# Altium PCB SensorBoard.PcbDoc
Units mil, origin at the board's own origin, x right, y up, seen from the top; angles counter-clockwise.
Board outline 3695 x 402.52 mil, 2 copper layers (Top Layer, Bottom Layer), stack 60.477 mil thick; 7 components, 4 nets, 22 pads, 23 vias.
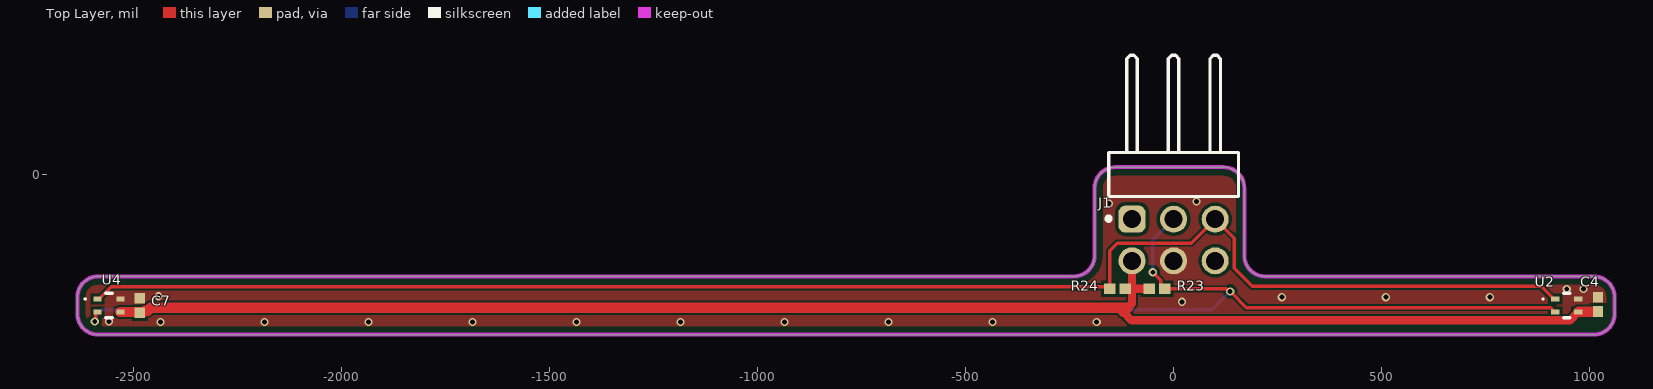
[diagram p0: Top Layer view]
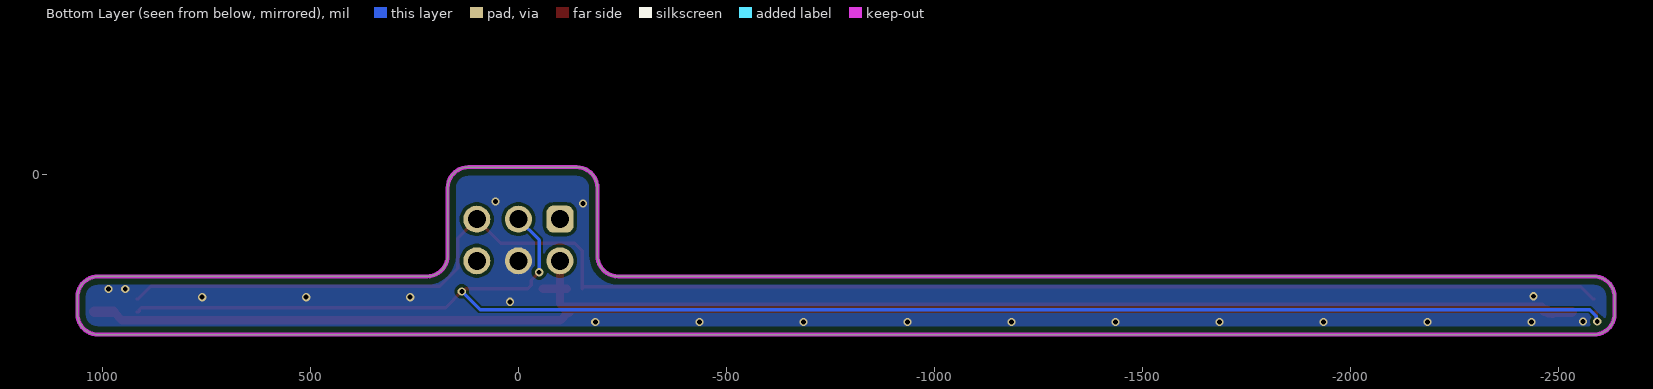
[diagram p1: Bottom Layer view, seen from below]

## Layer stack, top to bottom
Top Solder: solder mask 0.4, Solder Resist, Dk 3.5
Top Layer: signal copper 1.4
Dielectric 1: dielectric 57.6772, FR-4, Dk 4.8
Bottom Layer: signal copper 1.4
Bottom Solder: solder mask 0.4, Solder Resist, Dk 3.5

## Board outline
-2635,-335 -2635,-295 cw(c-2585,-295) -2585,-245 -240,-245 ccw(c-240,-195) -190,-195 -190,-32.48 cw(c-140,-32.48) -140,17.52 120,17.52 cw(c120,-32.48) 170,-32.48 170,-195 ccw(c220,-195) 220,-245 1010,-245 cw(c1010,-295) 1060,-295 1060,-335 cw(c1010,-335) 1010,-385 -2570,-385 -2585,-385 cw(c-2585,-335)

## Design rules (kind name [scope] priority, off if disabled: settings)
AssemblyTestPointUsage AssemblyTestPointUsage_1 [All] p2:
AssemblyTestpoint AssemblyTestpoint_1 [All] p2: testpointundercomponent=TRUE minsize=40 maxsize=100 preferedsize=60 minholesize=0 maxholesize=40 preferedholesize=32 testpointgrid=1 usegrid=TRUE gridtolerance=0.01 allowsidetop=TRUE allowsidebottom=TRUE
Clearance "Board outline clearance" [All vs OnLayer('Keep-Out Layer')] p1: gap=15 ignorepadtopadclearanceinfootprint=FALSE except(0: Arc-Hole Track-Hole SMDPad-Hole THPad-Hole Via-Hole Fill-Hole Poly-Hole Region-Hole Text-Hole)
Clearance Clearance_1 [All] p2: gap=7.87 ignorepadtopadclearanceinfootprint=FALSE except(0: Arc-Text Track-Text SMDPad-Text THPad-Text Via-Text Fill-Text Poly-Text Region-Text Text-Text; 4: Arc-Arc Arc-Track Arc-SMDPad Track-Track Track-SMDPad; 5: Arc-THPad Arc-Via Arc-Fill Arc-Poly Arc-Region Arc-Hole Track-THPad Track-Via Track-Fill Track-Poly Track-Region Track-Hole SMDPad-Hole THPad-Hole; 6: SMDPad-SMDPad; 8: SMDPad-THPad THPad-THPad; 10: Via-Via)
ComponentClearance [InComponent('L1')] p1: gap=0 collisioncheckmode=3 verticalgap=10 showdistances=FALSE
ComponentClearance UFL [InComponent('RF_CON1')] p2: gap=0 collisioncheckmode=3 verticalgap=10 showdistances=FALSE
ComponentClearance ComponentClearance_1 [All] p3: gap=10 collisioncheckmode=3 verticalgap=10 showdistances=FALSE
DiffPairsRouting DiffPairsRouting_1 [InDifferentialPair('D')] p1: maxlimit=11.81 minlimit=5 mostfreqgap=11.81 toplayer_minwidth=4 toplayer_maxwidth=5.83 toplayer_prefwidth=5 bottomlayer_minwidth=4 bottomlayer_maxwidth=5.83 bottomlayer_prefwidth=5 impedanceprofiledriven=TRUE maxuncoupledlength=500
FabricationTestPointUsage FabricationTestPointUsage_1 [All] p2: valid=0 allowmultiple=FALSE
FabricationTestpoint FabricationTestpoint_1 [All] p2: side=3 testpointundercomponent=TRUE minsize=40 maxsize=100 preferedsize=60 minholesize=0 maxholesize=40 preferedholesize=32 testpointgrid=1 allowsidetop=TRUE allowsidebottom=TRUE usegrid=TRUE gridtolerance=0.01
FanoutControl Fanout_LCC [IsLCC] p1: bgadir=Out bgaviamode=Centered fanoutstyle=Auto fanoutdirection=Alternating viagrid=1 // Fanout_LCC (Default Rule)
FanoutControl Fanout_BGA [IsBGA] p2: bgadir=Out bgaviamode=Centered fanoutstyle=Auto fanoutdirection=Alternating viagrid=1 // Fanout_BGA (Default Rule)
FanoutControl Fanout_Small [(CompPinCount < 5)] p3: bgadir=Out bgaviamode=Centered fanoutstyle=Auto fanoutdirection=OutThenIn viagrid=1 // Fanout_Small (Default Rule)
FanoutControl Fanout_SOIC [IsSOIC] p4: bgadir=Out bgaviamode=Centered fanoutstyle=Auto fanoutdirection=Alternating viagrid=1 // Fanout_SOIC (Default Rule)
FanoutControl Fanout_BGA_1 [IsBGA] p6: bgadir=Out bgaviamode=Centered fanoutstyle=Auto fanoutdirection=Alternating viagrid=1 // Fanout_BGA (Default Rule)
FanoutControl Fanout_LCC_1 [IsLCC] p7: bgadir=Out bgaviamode=Centered fanoutstyle=Auto fanoutdirection=Alternating viagrid=1 // Fanout_LCC (Default Rule)
FanoutControl Fanout_SOIC_1 [IsSOIC] p8: bgadir=Out bgaviamode=Centered fanoutstyle=Auto fanoutdirection=Alternating viagrid=1 // Fanout_SOIC (Default Rule)
FanoutControl Fanout_Small_1 [(CompPinCount < 5)] p9: bgadir=Out bgaviamode=Centered fanoutstyle=Auto fanoutdirection=OutThenIn viagrid=1 // Fanout_Small (Default Rule)
FanoutControl Fanout_Default_1 [All] p10: bgadir=Out bgaviamode=Centered fanoutstyle=Auto fanoutdirection=Alternating viagrid=1 // Fanout_Default (Default Rule)
Height Height_1 [All] p1: minheight=0 maxheight=1968.5 prefheight=500
HoleSize HoleSize_1 [All] p1: absolutevalues=TRUE maxlimit=590.55 minlimit=7.87 maxpercent=80.000 minpercent=20.000
HoleToHoleClearance u8 [All vs InComponent('u8_1')] p1: gap=0 allowstackedmicrovias=TRUE
HoleToHoleClearance [All] p2: gap=10 allowstackedmicrovias=TRUE
LayerPairs LayerPairs_1 [All] p1: enforce=TRUE
MinimumAnnularRing [All] p1: minimumring=3.94
MinimumSolderMaskSliver MinimumSolderMaskSliver_1 [All] p1 off: minsoldermaskwidth=7.87
NetAntennae NetAntennae_1 [All] p2: netantennaetolerance=0
PasteMaskExpansion PasteMaskExpansion_1 [All] p2: expansion=0
PlaneClearance PlaneClearance_1 [All] p1: clearance=20
PlaneConnect PlaneConnect_1 [All] p1: planeconnectstyle=Direct reliefexpansion=20 reliefentries=4 reliefconductorwidth=27.56 reliefairgap=10
PolygonConnect [All] p1: connectstyle=Direct reliefconductorwidth=20 reliefentries=4 polygonreliefangle="90 Angle" airgapwidth=10
RoutingCorners RoutingCorners_1 [All] p2: cornerstyle=45-Degree minsetback=100 maxsetback=100
RoutingLayers RoutingLayers_1 [All] p2: top layer_v5=TRUE bottom layer_v5=TRUE
RoutingPriority RoutingPriority_1 [All] p2: routingpriority=0
RoutingTopology RoutingTopology_1 [All] p2: topology=Shortest
RoutingVias RoutingVias_1 [All] p1: holewidth=11.81 width=19.68 viastyle="Through Hole" minholewidth=7.87 minwidth=15.75 maxholewidth=28 maxwidth=50
ShortCircuit ShortCircuit_Antenna [InComponent('J1')] p1: allowed=TRUE
ShortCircuit ShortCircuit_1 [All] p2: allowed=FALSE
SilkToSilkClearance SilkToSilkClearance_1 [All] p1: silktosilkclearance=0
SilkToSolderMaskClearance SilkToSolderMaskClearance_1 [IsPad] p1: minsilkscreentomaskgap=0 clearancetoexposedcopper=TRUE
SolderMaskExpansion [All] p1: expansion=4 istentingtop=FALSE
SolderMaskExpansion SolderMaskExpansion_1 [All] p2: expansion=4 istentingtop=FALSE
SupplyNets "Schematic Supply Nets_9" [InNet('3v3_dig@2A')] p1: voltage=0.000
SupplyNets "Schematic Supply Nets" [InNet('DGND')] p2: voltage=0.000
UnRoutedNet UnRoutedNet_1 [All] p1:
UnpouredPolygon UnpouredPolygon_1 [All] p2:
Width Width_1 [All] p1: maxlimit=314.96 minlimit=3.94 preferedwidth=7.87
13 further rules are at their usual default settings.

## Classes and differential pairs
component class Sensors: C4 C7 J1 U2 U4

## Components (designator, comment, footprint, x,y, rotation, side; value= is the part's Value field where it differs from the comment)
C4 "100nF 0402 X7R 50V" CAPC1005X55X25NL5T10 1020,-312.32 r270 top
C7 "100nF 0402 X7R 50V" CAPC1005X55X25NL5T10 -2485,-315 r270 top
J1 "61300621021" 61300621021 0,0 r180 top
R23 "4k7 0402 1%" RESC1005X40X25ML05T10 -40,-275 r0 top
R24 "4k7 0402 1%" RESC1005X40X25ML05T10 -135,-275 r180 top
U2 "SHT40-AD1B-R3" SHT40AD1BR3 944.88,-314.96 r0 top
U4 "SHT40-CD1B-R3" SHT40CD1BR3 -2559.06,-314.96 r0 top

## Footprints (in the part's own frame and the unit in brackets; to place one, negate y for a bottom-side part, rotate by r counter-clockwise, add the part's x,y. Pads: shape width x height; smd on the part's side, far side on the other; paste and mask are expansions set on the pad)
61300621021 [mm] "Pin Header, pitch 2.54 mm, THT, Angled, dual row, 6p"
  rrect50% 1.65x1.65 hole 1.1: 1(2.54,2.73)
  round 1.65 hole 1.1: 2(2.54,5.27) 3(0,2.73) 4(0,5.27) 5(-2.54,2.73) 6(-2.54,5.27)
  silkscreen extent -3.96,-7.27 4.09,2.82, body extent -3.81,-7.27 3.81,5.63, height 5.12
CAPC1005X55X25NL5T10 [mm] "Chip Capacitor, 2-Leads, Body 1.05x0.55mm, IPC Medium Density"
  rect 0.66x0.62 smd: 1(-0.44,0) 2(0.44,0)
  body extent -0.53,-0.28 0.53,0.28, height 0.55
RESC1005X40X25ML05T10 [mm] "Chip Resistor, 2-Leads, Body 1.00x0.50mm, IPC Low Density"
  rect 0.7x0.65 smd: 1(-0.475,0) 2(0.475,0)
  body extent -0.53,-0.27 0.53,0.28, height 0.4
SHT40AD1BR3 [mm]
  rect 0.5x0.3 smd: 1(-0.7,0.4) 2(-0.7,-0.4) 3(0.7,-0.4) 4(0.7,0.4)
  silkscreen extent -1.5,-0.75 0.2,0.75, body extent -0.75,-0.75 0.75,0.75, height 0.54
SHT40CD1BR3 [mm]
  rect 0.5x0.3 smd: 1(-0.7,0.4) 2(-0.7,-0.4) 3(0.7,-0.4) 4(0.7,0.4)
  silkscreen extent -1.5,-0.75 0.2,0.75, body extent -0.75,-0.75 0.75,0.75, height 0.69

## Part data
C4 C7: library part CMP-1662-00020-1, LCSC_PN=C77020, ComponentLink1Description="Manufacturer URL", ComponentLink1URL=http://www.murata.com/, ComponentLink2Description=Datasheet, ComponentLink2URL=http://psearch.en.murata.com/capacitor/product/GRM155R60J105KE19%23.pdf
J1: library part CMP-1502-01071-5, "THT Angled Pin Header WR-PHD, Pitch 2.54 mm, Dual Row, 6 pins", Color=Black, Contact Resistance=20mΩ, Current Rating=3A, LCSC_PN=C239334, Max Operating Temperature=105°C, Min Operating Temperature=-40°C, Operating Supply Voltage=250V, Connector Type="Male Pin", Contact Material=Gold, Contact Mating Length=5.9944mm, Contact Plating=Gold, Gender=Male, Height=5.23mm, Lead Pitch=2.54mm, Mount="Through Hole", Number of Contacts=6, Number of Pins=6, Number of Positions=6, Number of Rows=2, Packaging=Bulk, Pitch=2.54mm, RoHS=Compliant, Row Spacing=2.54mm, Termination=Solder, Voltage Rating=250V
R23 R24: library part CMP-2002-07472-1, LCSC_PN=C105871
U2: "Integrated Circuit", LCSC_PN=C2848306, Manufacturer_Name=Sensirion, Mouser Part Number=403-SHT40-AD1B-R3, Arrow Part Number=SHT40-AD1B-R3, Arrow Price/Stock=https://www.arrow.com/en/products/sht40-ad1b-r3/sensirion-ag?utm_currency=USD&region=asia, Datasheet Link=https://www.arrow.com/en/products/sht40-ad1b-r3/sensirion-ag, Height=0.59mm, Manufacturer_Part_Number=SHT40-AD1B-R3, Mouser Price/Stock=https://www.mouser.co.uk/ProductDetail/Sensirion/SHT40-AD1B-R3?qs=zW32dvEIR3sa7U6cFW6pBw%3D%3D
U4: "Integrated Circuit", LCSC_PN=C7461852, Manufacturer_Name=Sensirion, Mouser Part Number=403-SHT40-CD1B-R3, Arrow Part Number=SHT40-CD1B-R3, Arrow Price/Stock=https://www.arrow.com/en/products/sht40-cd1b-r3/sensirion-ag?utm_currency=USD&region=nac, Datasheet Link=https://sensirion.com/media/documents/33FD6951/6555C40E/Sensirion_Datasheet_SHT4x.pdf, Height=0.59mm, Manufacturer_Part_Number=SHT40-CD1B-R3, Mouser Price/Stock=https://www.mouser.co.uk/ProductDetail/Sensirion/SHT40-CD1B-R3?qs=ulEaXIWI0c%2FeyXO6eo5KrQ%3D%3D

## Via types
v1: diameter 19.68, hole 11.81, Top Layer to Bottom Layer, tented both sides, 23 vias

## Nets (pads, with @x,y where several pads share a name; then routed paths per layer and width w, separated by ;. In a path a pad name is that pad's centre, name@x,y a point inside that pad or via, vN(x,y) a via of type N, cw(c..) or ccw(c..) an arc to the next point about the centre after c; other vN are vias at no path point)
3v3_dig@2A: C4.2 C7.2 J1.2 R23.1 R24.1 U2.3 U4.3 | length 3773.8
  Top Layer w20: -120.71,-330.71 -100.8,-350.61 952.54,-350.61 U2.3 ; R24.1 -100,-275 ; -110,-320 -100,-310 -100,-275 ; J1.2 -100,-275 ; R23.1 -100,-275
  Top Layer w25: U4.3 C7.2@-2485,-330.71 ; C7.2 -2485,-332.13 -2484.7,-331.83 -2476.57,-331.83 -2471.91,-327.17 -2465.96,-327.17 -2458.79,-320 -110,-320 -120.71,-330.71 ; U2.3 973.5,-329.65 C4.2
DGND: C4.1 C7.1 J1.4 U2.4 U4.4
  other v1: -2435,-355 -2185,-355 -1935,-355 -1685,-355 -1435,-355 -1185,-355 -935,-355 -685,-355 -435,-355 -185,-355 -2559.26,-353.44 20,-306.16 260,-295 510,-295 760,-295 -2440,-292.66 945,-275 985,-275 -155,-70 55,-65
SCL_TS: J1.3 R23.2 U2.2 U4.2 | length 3956.8
  Top Layer w8: v1(-2593.35,-353.35) -2591.11,-351.11 -2591.11,-332.61 -2589.21,-330.71 U4.2 ; v1(-50,-235) -31.08,-253.92 -31.08,-266.2 -22.28,-275 R23.2 126.84,-275 132.84,-281 v1(136,-281) 175,-320 906.61,-320 911.48,-324.87 911.48,-328.8 913.39,-330.71 U2.2
  Bottom Layer w8: v1(-2593.35,-353.35) -2591.11,-351.11 -2591.11,-341.11 -2575,-325 92,-325 v1(136,-281) ; v1(-50,-235) -50,-157.48 J1.3
SDA_TS: J1.5 R24.2 U2.1 U4.1 | length 3760.6
  Top Layer w8: U4.1 -2582.68,-299.21 -2553.46,-270 R24.2@-153.7,-270 ; R24.2 R24.2@-153.7,-270 ; U2.1 913.39,-299.21 883.17,-269 189.35,-269 146,-225.65 146,-153.48 J1.5 42.48,-165 -135,-165 -153.7,-183.7 R24.2@-153.7,-270
pads on no net: J1.1 J1.6

## Polygon pours and split planes (outlines as drawn)
DGND on Top Layer "DGND_L01_P001" (solid, remove dead copper, pour order 1): -2765,130 -2765,-695 -2590,-870 755,-870 1155,-470 1155,165 1110,210
DGND on Bottom Layer "DGND_L02_P000" (solid, remove dead copper, pour order 0): -2765,135 -2765,-690 -2590,-865 755,-865 1155,-465 1155,170 1110,215

## Keep-outs
Keep-Out Layer:
  lines w10: -2635,-335 ccw(c-2585,-335) -2585,-385 -2570,-385 1010,-385 ccw(c1010,-335) 1060,-335 1060,-310 1060,-295 ccw(c1010,-295) 1010,-245 995,-245 220,-245 cw(c220,-195) 170,-195 170,-32.48 ccw(c120,-32.48) 120,17.52 -140,17.52 ccw(c-140,-32.48) -190,-32.48 -190,-195 cw(c-240,-195) -240,-245 -2570,-245 -2585,-245 ccw(c-2585,-295) -2635,-295 -2635,-315 -2635,-335